# Altium PCB Power-PCB-v1.0.PcbDoc (part 1 of 3)
Units mil, origin at the board's own origin, x right, y up, seen from the top; angles counter-clockwise.
Board outline 5472.44 x 5472.44 mil, 2 copper layers (Top Layer, Bottom Layer), stack 61.855 mil thick; 76 components, 43 nets, 196 pads, 129 vias.
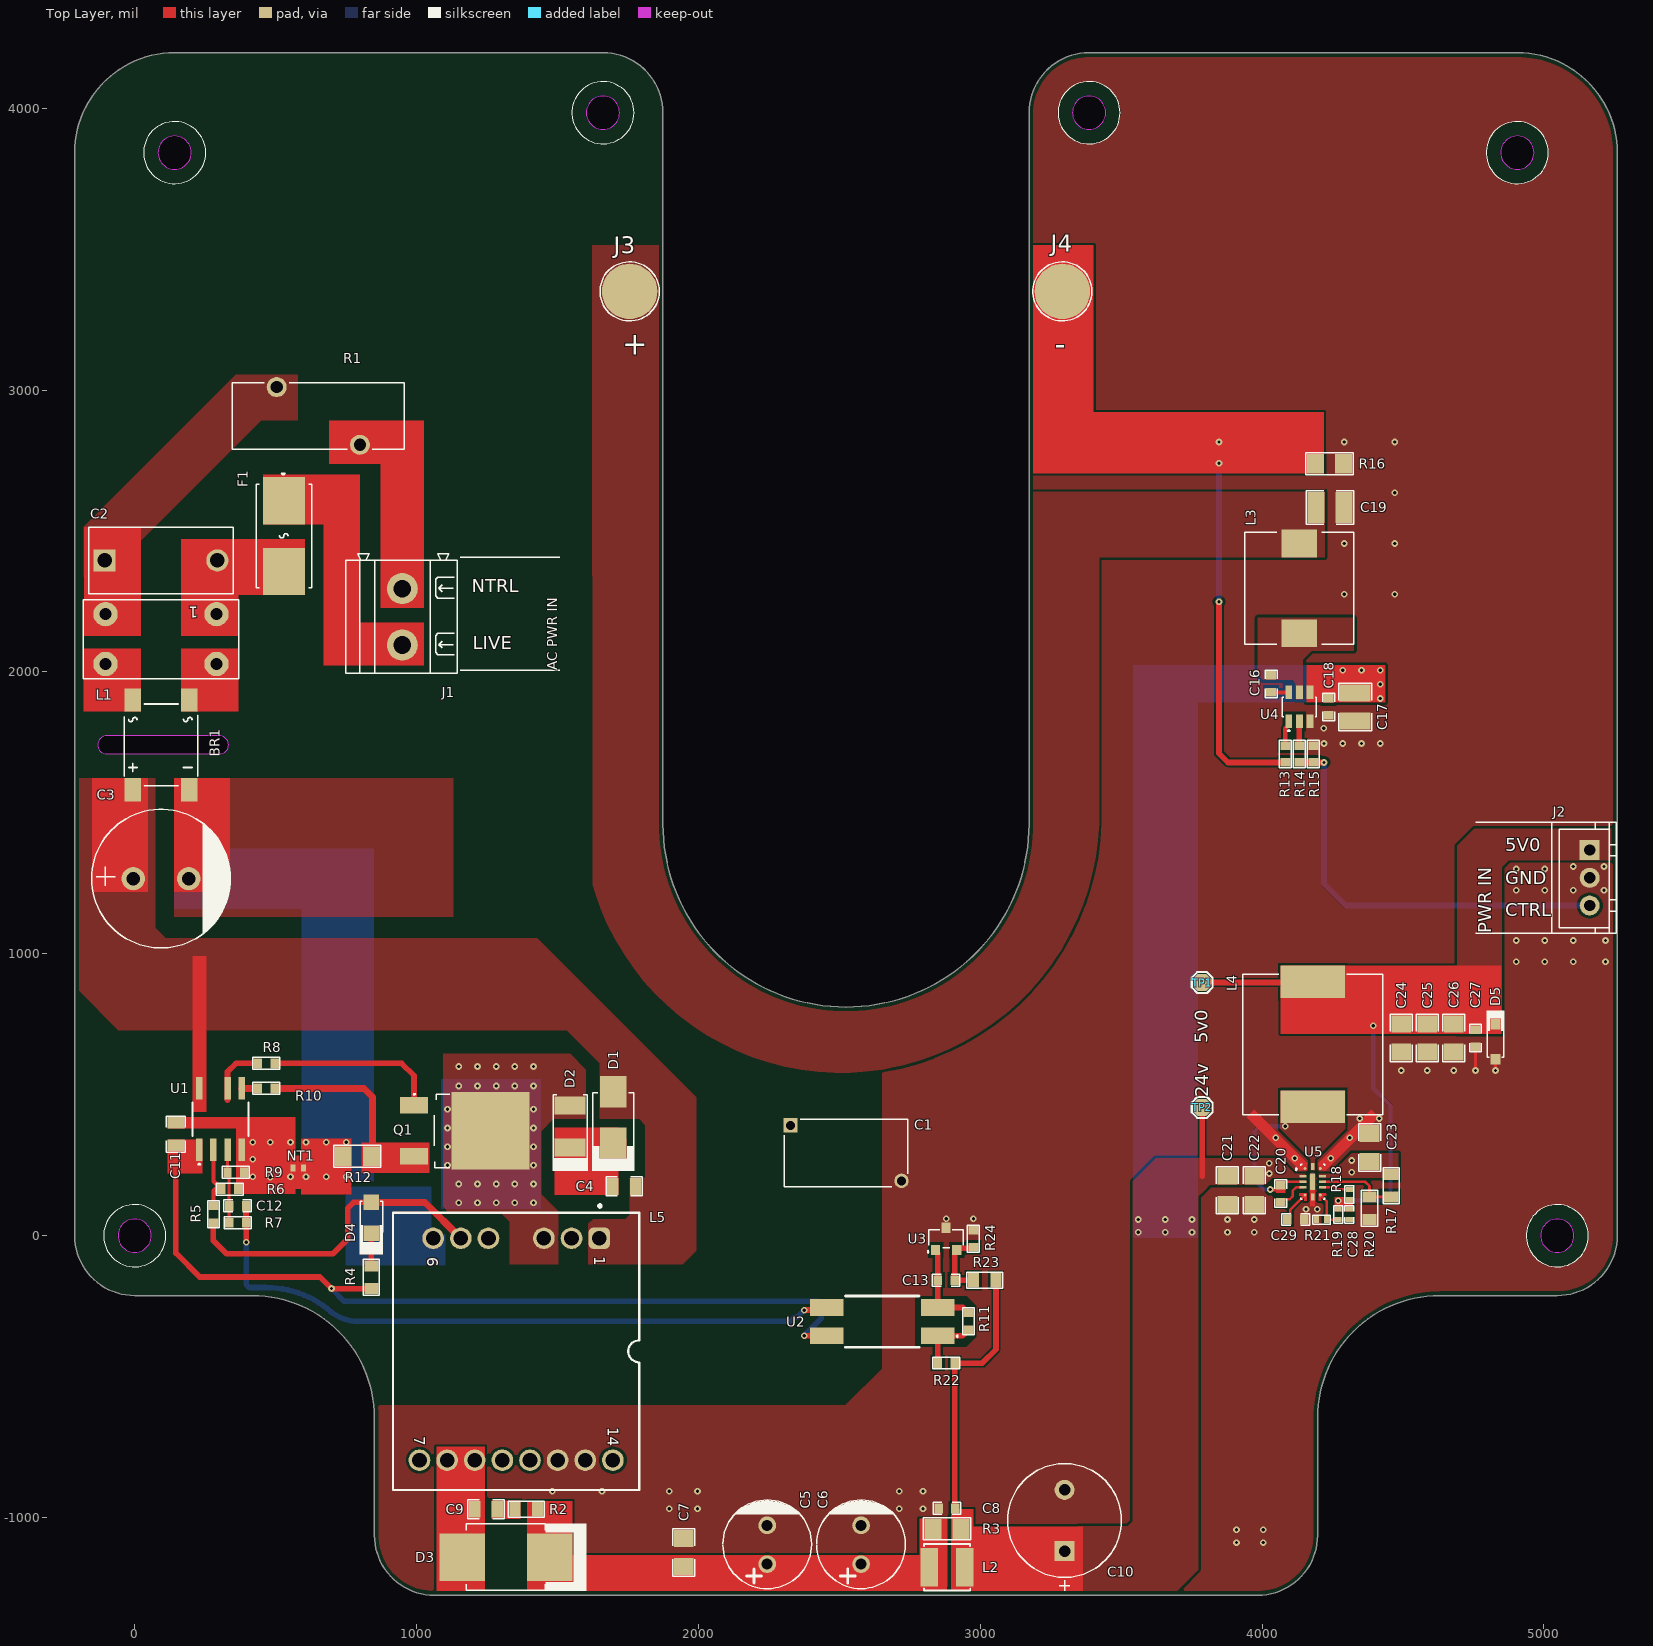
[diagram p0: Top Layer view]
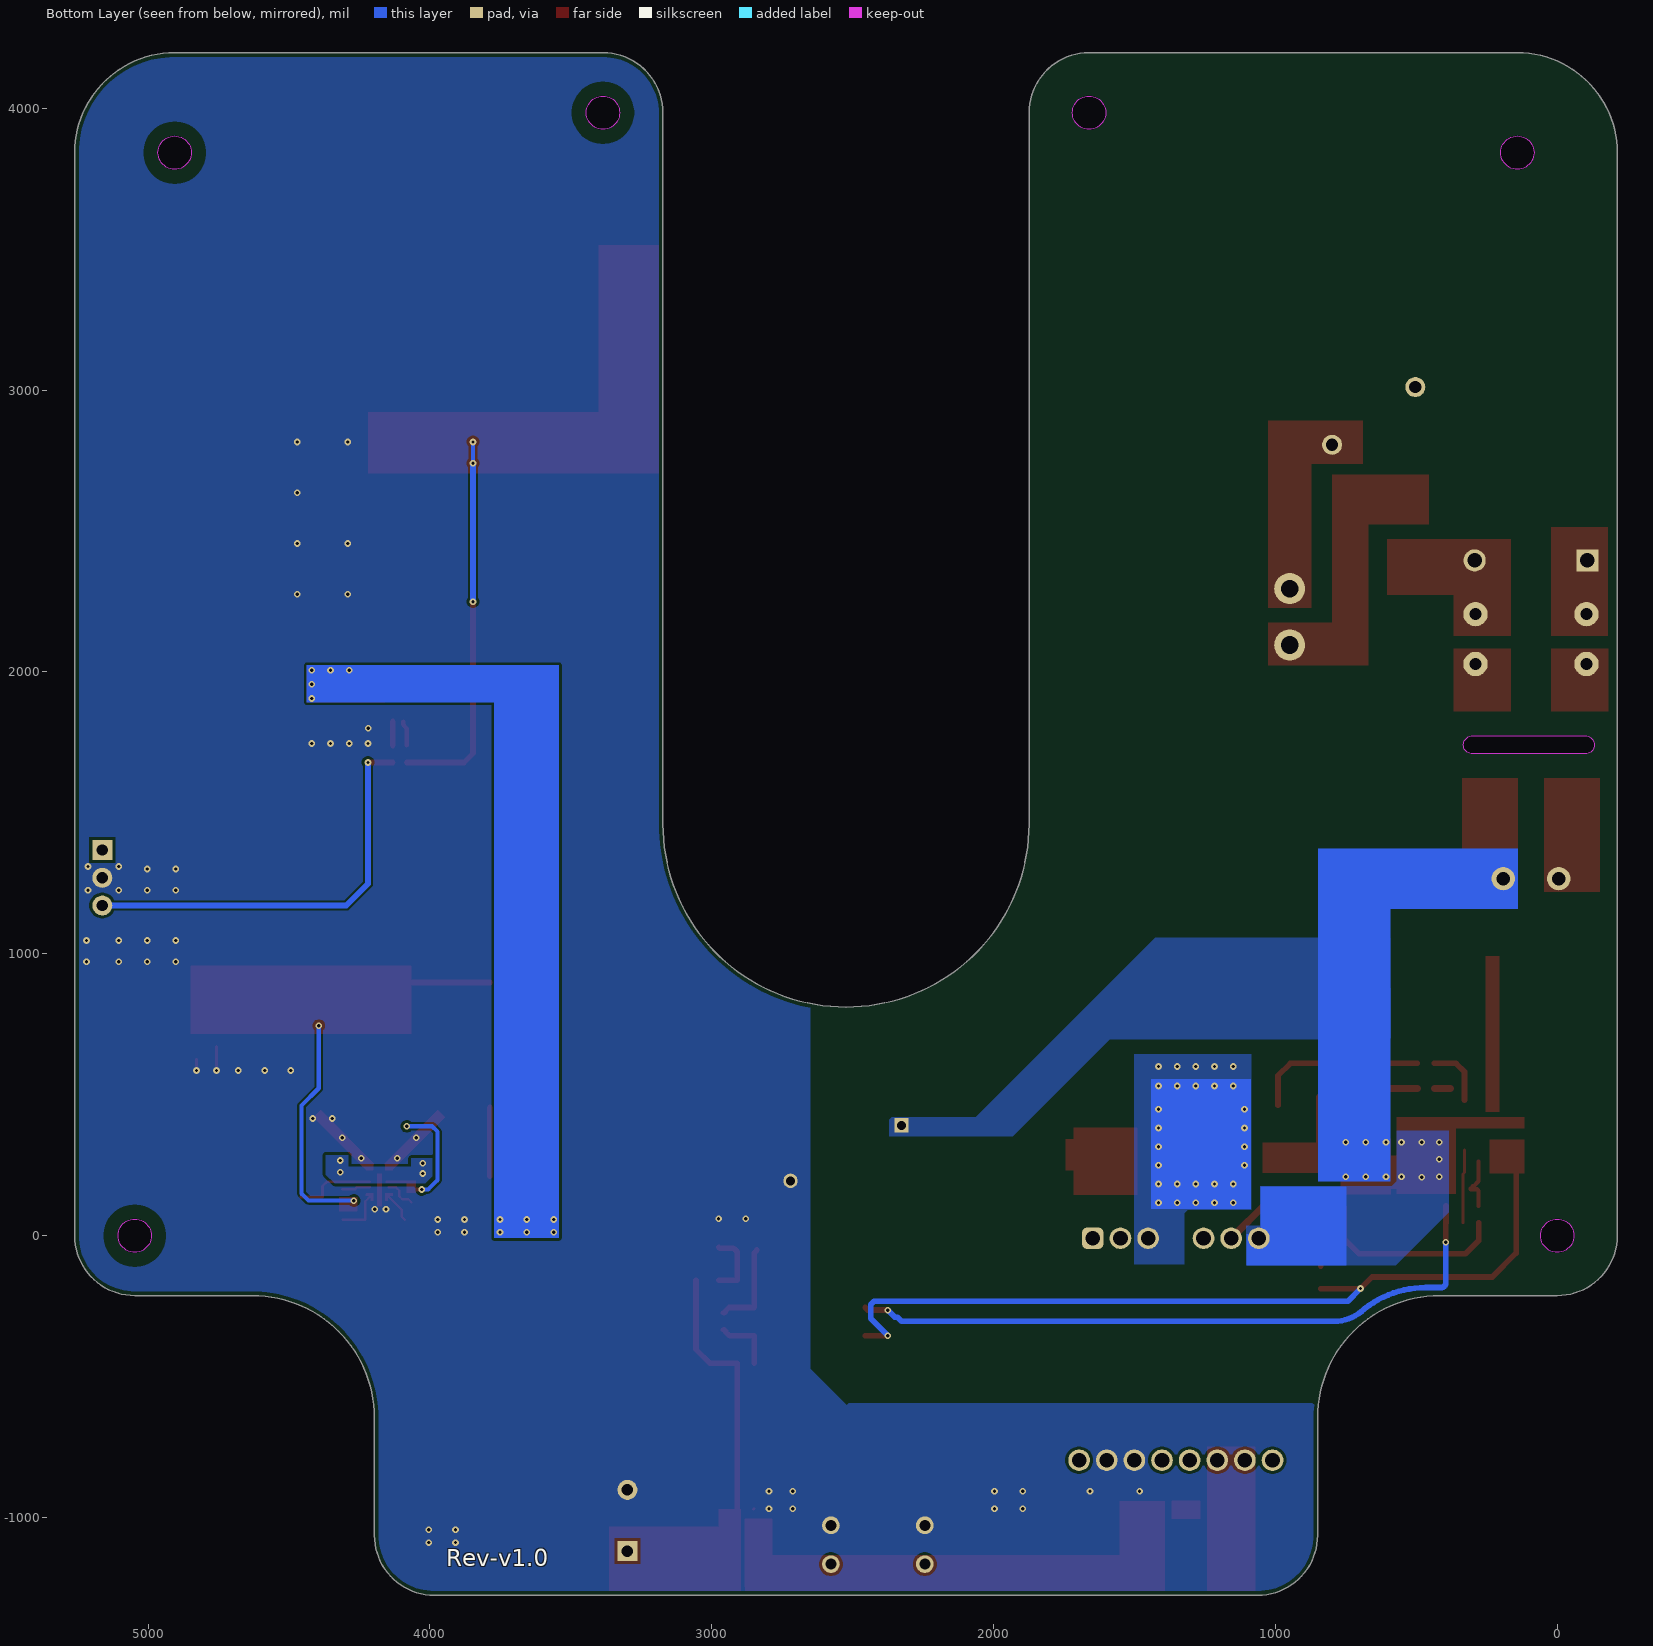
[diagram p1: Bottom Layer view, seen from below]
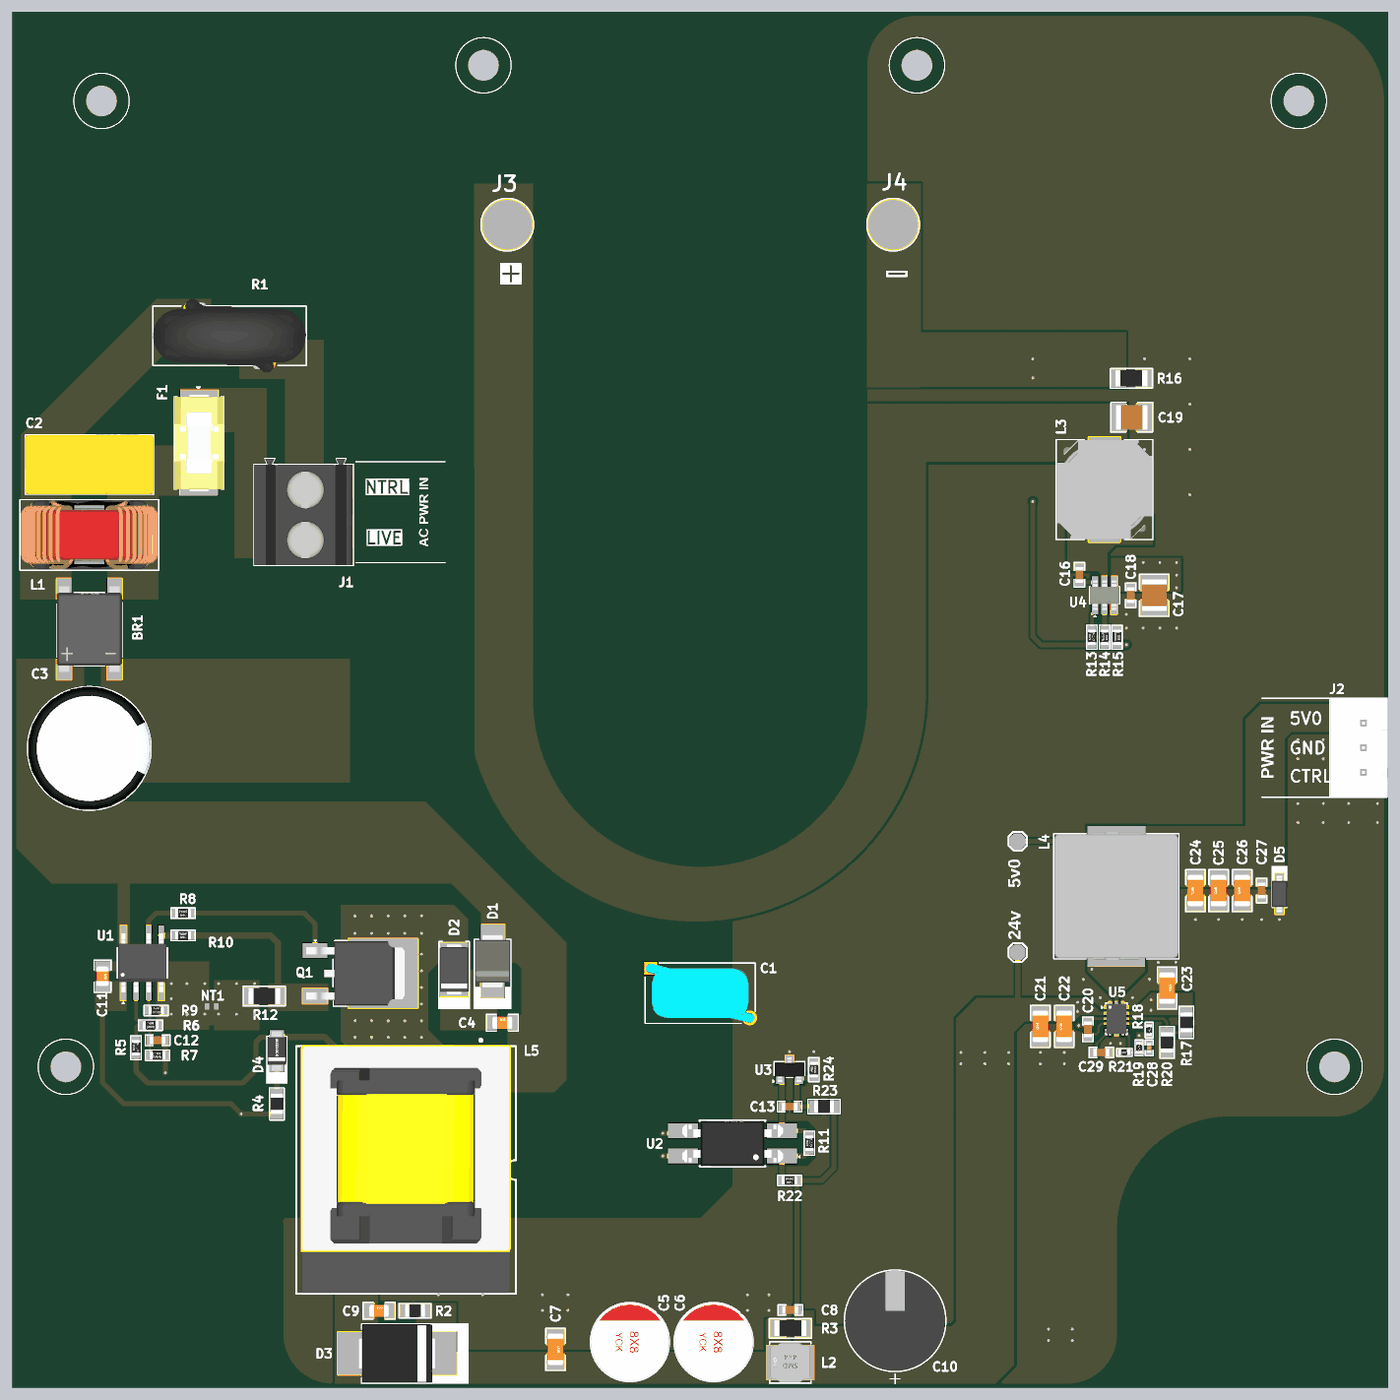
[diagram p3: 3D render of the assembled board from above, using the file's embedded part models]

## Layer stack, top to bottom
Top Solder: solder mask 0.4, Solder Resist, Dk 3.5
Top Layer: signal copper 1.4
Dielectric 1: dielectric 59.0551, FR-4, Dk 4.8
Bottom Layer: signal copper 1.4
Bottom Solder: solder mask 0.4, Solder Resist, Dk 3.5

## Board outline
0,-212.6 417.32,-212.6 cw(c417.32,-645.67) 850.39,-645.67 850.39,-1062.99 ccw(c1062.99,-1062.99) 1062.99,-1275.59 3984.25,-1275.59 ccw(c3984.25,-1062.99) 4196.85,-1062.99 4196.85,-645.67 cw(c4629.92,-645.67) 4629.92,-212.6 5047.24,-212.6 ccw(c5047.24,0) 5259.84,0 5259.84,3842.52 ccw(c4905.51,3842.52) 4905.51,4196.85 3385.83,4196.85 ccw(c3385.83,3984.25) 3173.23,3984.25 3173.23,1460.63 cw(c2523.62,1460.63) 1874.02,1460.63 1874.02,3984.25 ccw(c1661.42,3984.25) 1661.42,4196.85 141.73,4196.85 ccw(c141.73,3842.52) -212.6,3842.52 -212.6,0 ccw(c0,0)
cut-out: -99.46,1709.22 301.14,1709.22 ccw(c301.14,1741.26) 333.18,1741.26 ccw(c301.14,1741.26) 301.14,1773.3 -99.46,1773.3 ccw(c-99.46,1741.26) -131.5,1741.26 ccw(c-99.46,1741.26)
cut-out: 1602.36,3984.25 ccw(c1661.42,3984.25) 1661.42,3925.2 ccw(c1661.42,3984.25) 1720.47,3984.25 ccw(c1661.42,3984.25) 1661.42,4043.31 ccw(c1661.42,3984.25)
cut-out: 4988.19,0 ccw(c5047.24,0) 5047.24,-59.06 ccw(c5047.24,0) 5106.3,0 ccw(c5047.24,0) 5047.24,59.06 ccw(c5047.24,0)
cut-out: -59.06,0 ccw(c0,0) 0,-59.06 ccw(c0,0) 59.06,0 ccw(c0,0) 0,59.06 ccw(c0,0)
cut-out: 4846.46,3842.52 ccw(c4905.51,3842.52) 4905.51,3783.46 ccw(c4905.51,3842.52) 4964.57,3842.52 ccw(c4905.51,3842.52) 4905.51,3901.57 ccw(c4905.51,3842.52)
cut-out: 3326.77,3984.25 ccw(c3385.83,3984.25) 3385.83,3925.2 ccw(c3385.83,3984.25) 3444.88,3984.25 ccw(c3385.83,3984.25) 3385.83,4043.31 ccw(c3385.83,3984.25)
cut-out: 82.68,3842.52 ccw(c141.73,3842.52) 141.73,3783.46 ccw(c141.73,3842.52) 200.79,3842.52 ccw(c141.73,3842.52) 141.73,3901.57 ccw(c141.73,3842.52)

## Design rules (kind name [scope] priority, off if disabled: settings)
BoardOutlineClearance [All] p1: gap=0 ignorepadtopadclearanceinfootprint=FALSE except(15: Poly-OutlineEdge)
Clearance [All] p1: gap=10 ignorepadtopadclearanceinfootprint=TRUE except(7: Track-Track; 7.01: Arc-Track Arc-SMDPad Arc-Fill Arc-Poly Track-SMDPad Track-Fill Track-Poly SMDPad-Fill; 7.99: Fill-Fill; 8: Fill-Poly)
HoleSize [All] p1: absolutevalues=TRUE maxlimit=122.05 minlimit=1 maxpercent=80.000 minpercent=20.000
HoleToHoleClearance [All] p1: gap=0 allowstackedmicrovias=TRUE
MinimumSolderMaskSliver [All] p1: minsoldermaskwidth=0
PolygonConnect [All] p1: connectstyle=Direct reliefconductorwidth=10 reliefentries=4 polygonreliefangle="90 Angle" airgapwidth=10
RoutingVias [All] p1: holewidth=11.81 width=23.62 viastyle="Through Hole" minholewidth=11.81 minwidth=23.62 maxholewidth=11.81 maxwidth=23.62
SilkToSilkClearance [All] p1: silktosilkclearance=0
SilkToSolderMaskClearance [IsPad] p1: minsilkscreentomaskgap=0 clearancetoexposedcopper=TRUE
SolderMaskExpansion [All] p1: expansion=4 istentingtop=FALSE
SupplyNets "Schematic Supply Nets_7" [InNet('HV_DC')] p1: voltage=0.000
SupplyNets "Schematic Supply Nets_6" [InNet('P-SGND')] p2: voltage=0.000
SupplyNets "Schematic Supply Nets_5" [InNet('Live')] p3: voltage=0.000
SupplyNets "Schematic Supply Nets_4" [InNet('GND')] p4: voltage=0.000
SupplyNets "Schematic Supply Nets_3" [InNet('24V')] p5: voltage=0.000
SupplyNets "Schematic Supply Nets_2" [InNet('Neutral')] p6: voltage=0.000
SupplyNets "Schematic Supply Nets_1" [InNet('5V')] p7: voltage=0.000
SupplyNets "Schematic Supply Nets" [InNet('PGND')] p8: voltage=0.000
Width [All] p1: maxlimit=25 minlimit=7.99 preferedwidth=10 toplayer_minwidth=8 minimp=50.000000 maximp=50.000000 favimp=50.000000
25 further rules are at their usual default settings.

## Classes and differential pairs
component class U_Main_Power_Sheet: BR1 C1 C2 C3 C4 C5 C6 C7 C8 C9 C10 C11 C12 C13 D1 D2 D3 D4 F1 J1 L1 L2 L5 NT1 Q1 R1 R2 R3 R4 R5 R6 R7 R8 R9 R10 R11 R12 R22 R23 R24 U1 U2 U3
component class U_DRIVER_BUC_Sheet: C16 C17 C18 C19 C20 C21 C22 C23 C24 C25 C26 C27 C28 C29 D5 J2 J3 J4 L3 L4 R13 R14 R15 R16 R17 R18 R19 R20 R21 TP1 TP2 U4 U5

## Components (designator, comment, footprint, x,y, rotation, side; value= is the part's Value field where it differs from the comment)
BR1 "MSB40M" UMSB 93.4,1741.26 r90 top
C1 "1.5nF" DCF152M36Y5UG6BL0AA 2523.62,293.09 r0 top
C2 "100nF" MP2104K27C3X6LC 93.4,2395.81 r0 top
C3 "82uF" LKML2002E820MF 93.41,1266.81 r0 top
C4 "1000pF" Cap-0805 1736.44,175.11 r0 top
C5 "220uF" 35ZLH220MEFC8X11.5 2244.03,-1096.46 r90 top
C6 "220uF" 35ZLH220MEFC8X11.5 2577.03,-1096.46 r90 top
C7 "6.8uF" Cap-1206 1948.03,-1124.02 r270 top
C8 "0.1uF" Cap-0603 2882.03,-967.36 r0 top value=100nF
C9 "1000pF" Cap-0805 1246.39,-970.64 r0 top
C10 "470uF" ELXZ350ELL471MJ20S 3299.03,-1010.31 r90 top
C11 "10uF" Cap-0805 146.03,360.39 r270 top
C12 "47nF" Cap-0603 365.03,105.8 r180 top
C13 "560pF" Cap-0603 2879.03,-157.95 r0 top
C16 "0.1uF" Cap-0603 4032.03,1957.62 r90 top value=100nF
C17 "10uF" Cap-1210 4330.03,1876.05 r90 top
C18 "0.1uF" Cap-0603 4236.03,1876.05 r90 top value=100nF
C19 "10uF" Cap-1210 4240.85,2583.87 r180 top locked
C20 "0.1uF" Cap-0603 4066.03,149.05 r270 top value=100nF
C21 "4.7uF" Cap-1206 3877.03,161.05 r90 top
C22 "220nF" Cap-1206 3972.03,161.05 r90 top
C23 "220nF" Cap-1206 4381.03,313.16 r270 top
C24 "47uF" Cap-1206 4494.03,701.05 r90 top
C25 "47uF" Cap-1206 4586.03,701.05 r90 top
C26 "47uF" Cap-1206 4680.03,701.05 r90 top
C27 "0.1uF" Cap-0603 4757.03,701.05 r90 top value=100nF
C28 "6.8pF" Cap-0402 4309.65,75.73 r90 top
C29 "1uF" Cap-0603 4119.48,57.23 r180 top
D1 "SMBJ170A-TR" SMB_ 1697.7,420.14 r270 top
D2 "US1M-13-F" SMA(DO-214AC) 1544.44,387.31 r90 top value=10pF
D3 "MBRS4201T3G" SMC 1317.39,-1140.64 r180 top
D4 "PMEG10010ELRX" SOD-123W 839.44,62.99 r270 top value=28pF
D5 "AZ3005-01G" SOD-123 4828.03,687.9 r90 top
F1 "0154003.DR" 0154003.DR 530.03,2482.05 r270 top value=22.7mR
J1 "DB128L-5.08-2P-BK-S" DB128L-5.08-2P-BK-S 949.41,2195.63 r270 top
J2 "XH-3A" XH-3A 5162.24,1269.78 r90 top
J3 "5mm Pad SMD" "5mm Pad SMD" 1755.91,3350.39 r0 top
J4 "5mm Pad SMD" "5mm Pad SMD" 3291.34,3350.39 r0 top
L1 "744821201" 744821201 93.4,2116.81 r180 top
L2 "CR4030-1R0N" CR4030-1R0N 2882.03,-1176.36 r0 top
L3 "4.7uH" YSLF1045-4R7M 4132.03,2296.5 r90 top locked
L4 "15uH" SRP1265A-150M 4179.48,678.62 r270 top
L5 "750343466" 750343466 1353.44,-402.89 r270 top
NT1 "Net Tie_SMD" "Net Tie Pad" 580.03,240.05 r0 top net-tie
Q1 "SM600R65CT9RL" TO-252-2L 1126.52,371.94 r270 top
R1 "MF72 5D13" "MF72 5D13" 651.39,2908.41 r180 top
R2 "10R" RES-0805 1389.44,-970.64 r0 top
R3 "2R" Res-1206 2882.03,-1040.36 r0 top
R4 "10R" RES-0805 839.44,-147.61 r90 top
R5 "75K" Res-0603 279.31,75.8 r270 top value=75kR
R6 "24K" Res-0603 337.18,165.15 r180 top
R7 "100K" Res-0603 365.03,45.8 r180 top value=100kR
R8 "0R" Res-0603 466.45,611.39 r0 top
R9 "22K" Res-0603 359.31,224.5 r180 top value=22kR
R10 "2.7K" Res-0603 466.45,522.8 r0 top
R11 "1K" Res-0603 2958.18,-303.95 r270 top
R12 "0.43R" Res-1206 789.44,281.39 r0 top
R13 "0R" Res-0603 4082.43,1709.05 r270 top
R14 "1K" Res-0603 4132.03,1709.05 r90 top
R15 "100K" Res-0603 4181.64,1709.05 r90 top value=100kR
R16 "0.2R" Res-1206 4239.03,2739.05 r180 top value=200mR
R17 "698K" RES-0805 4458.03,177.23 r90 top value=698kR
R18 "100K" Res-0402 4309.65,146.09 r90 top
R19 "100K" Res-0402 4269.65,75.73 r90 top
R20 "51.1K" RES-0805 4381.03,97.23 r90 top value=51.1kR
R21 "24.9K" Res-0402 4210.86,57.23 r0 top
R22 "1.5K" Res-0603 2879.03,-451.95 r0 top
R23 "383K" RES-0805 3015.68,-157.95 r0 top
R24 "44.2K" Res-0603 2975.68,-11.32 r270 top
TP1 "TEST POINT" Test-point 3787.03,898.05 r0 top
TP2 "TEST POINT" Test-point 3787.03,455.05 r0 top
U1 "UCC28740DR" 7-SOIC 304.31,413.65 r90 top
U2 "LTV-817S-TA1-C" LTV-817S-TA1-C 2652.18,-304.95 r180 top
U3 "TL431BQDBZT" SOT-23 2879.03,-11.32 r0 top
U4 "TPS92200D2DDCR" SOT-23-6 4132.03,1876.05 r90 top
U5 "LM60440AQRPKRQ1" "13-WQFN-HR (3x2)" 4179.48,191.36 r0 top

## Footprints (in the part's own frame and the unit in brackets; to place one, negate y for a bottom-side part, rotate by r counter-clockwise, add the part's x,y. Pads: shape width x height; smd on the part's side, far side on the other; paste and mask are expansions set on the pad)
"5mm Pad SMD" [mm]
  round 5 smd: 1(0,0)
  silkscreen extent -2.66,-2.67 2.67,2.67
7-SOIC [mm]
  rect 2.045x0.588 smd: 1(-2.772,1.905) 2(-2.772,0.635) 3(-2.772,-0.635) 4(-2.772,-1.905) 5(2.772,-1.905) 6(2.772,-0.635) 7(2.772,1.905)
  silkscreen extent -4.1,-2.53 1.52,2.53, body extent -3,-2.45 3,2.45, height 1.75
"13-WQFN-HR (3x2)" [mm]
  round 0.244 smd: 1(-0.694,1.194) 5(-0.694,-1.194) 7(0.694,-1.194) 11(0.694,1.194)
  rrect40% 0.65x0.25 smd: 2(-0.875,0.5) 3(-0.875,0) 4(-0.875,-0.5) 8(0.875,-0.5) 9(0.875,0) 10(0.875,0.5)
  rrect29% 0.35x0.65 smd: 6(0,-1.375) 12(0,1.375)
  rrect22% 0.45x1.45 smd: 13(0,0)
  Top Layer region: 1.2,-1.075 1.2,-1.225 1.196,-1.244 1.185,-1.26 1.169,-1.271 1.15,-1.275 1.15,-1.275 0.825,-1.275 0.806,-1.279 0.79,-1.29 0.779,-1.306 0.775,-1.325 0.775,-1.325 0.775,-1.65 0.771,-1.669 0.76,-1.685 0.744,-1.696 0.725,-1.7 0.725,-1.7 0.575,-1.7 0.55,-1.693 0.532,-1.675 0.525,-1.65 0.525,-1.65 0.525,-1.075 0.529,-1.056 0.54,-1.04 0.556,-1.029 0.575,-1.025 0.575,-1.025 1.15,-1.025 1.169,-1.029 1.185,-1.04 1.196,-1.056 1.2,-1.075 1.2,-1.075
  Top Layer region: -0.575,-1.7 -0.725,-1.7 -0.744,-1.696 -0.76,-1.685 -0.771,-1.669 -0.775,-1.65 -0.775,-1.65 -0.775,-1.325 -0.779,-1.306 -0.79,-1.29 -0.806,-1.279 -0.825,-1.275 -0.825,-1.275 -1.15,-1.275 -1.169,-1.271 -1.185,-1.26 -1.196,-1.244 -1.2,-1.225 -1.2,-1.225 -1.2,-1.075 -1.193,-1.05 -1.175,-1.032 -1.15,-1.025 -1.15,-1.025 -0.575,-1.025 -0.556,-1.029 -0.54,-1.04 -0.529,-1.056 -0.525,-1.075 -0.525,-1.075 -0.525,-1.65 -0.529,-1.669 -0.54,-1.685 -0.556,-1.696 -0.575,-1.7 -0.575,-1.7
  Top Layer region: -1.2,1.225 -1.196,1.244 -1.185,1.26 -1.169,1.271 -1.15,1.275 -1.15,1.275 -0.825,1.275 -0.806,1.279 -0.79,1.29 -0.779,1.306 -0.775,1.325 -0.775,1.325 -0.775,1.65 -0.771,1.669 -0.76,1.685 -0.744,1.696 -0.725,1.7 -0.725,1.7 -0.575,1.7 -0.55,1.693 -0.532,1.675 -0.525,1.65 -0.525,1.65 -0.525,1.075 -0.529,1.056 -0.54,1.04 -0.556,1.029 -0.575,1.025 -0.575,1.025 -1.15,1.025 -1.169,1.029 -1.185,1.04 -1.196,1.056 -1.2,1.075 -1.2,1.075
  Top Layer region: 0.575,1.7 0.725,1.7 0.744,1.696 0.76,1.685 0.771,1.669 0.775,1.65 0.775,1.65 0.775,1.325 0.779,1.306 0.79,1.29 0.806,1.279 0.825,1.275 0.825,1.275 1.15,1.275 1.169,1.271 1.185,1.26 1.196,1.244 1.2,1.225 1.2,1.225 1.2,1.075 1.193,1.05 1.175,1.032 1.15,1.025 1.15,1.025 0.575,1.025 0.556,1.029 0.54,1.04 0.529,1.056 0.525,1.075 0.525,1.075 0.525,1.65 0.529,1.669 0.54,1.685 0.556,1.696 0.575,1.7 0.575,1.7
  silkscreen extent -1.52,-1.59 1.1,1.59, body extent -1,-1.5 1,1.5, height 0.7
35ZLH220MEFC8X11.5 [mm]
  round 1.6 hole 1: 1(-1.75,0) 2(1.75,0)
  silkscreen extent -3.96,-4 4.04,4, body extent -3.96,-4.01 4.04,4, height 8
0154003.DR [mil]
  rect 167x150 smd: 1(-125.5,0) 2(125.5,0)
  silkscreen extent -223,-99 184,99, body extent -192,-99 192,99, height 150
744821201 [mm]
  round 2.2 hole 1.1: 1(-5,-2.25) 2(5,-2.25) 3(5,2.25) 4(-5,2.25)
  silkscreen extent -7.01,-3.56 7.01,3.59, body extent -6.95,-3.5 6.95,3.54, height 16.82
750343466 [mm]
  rrect50% 1.95x1.95 hole 1.32: 1(-10,7.48)
  round 1.95 hole 1.32: 2(-10,4.99) 3(-10,2.5) 4(-10,-2.5) 5(-10,-4.99) 6(-10,-7.48) 7(10,-8.715) 8(10,-6.225) 9(10,-3.735) 10(10,-1.245) 11(10,1.245) 12(10,3.735) 13(10,6.225) 14(10,8.715)
  silkscreen extent -13.03,-11.1 12.69,11.1, body extent -12.45,-10.62 12.64,10.58, height 15.45
Cap-0402 [mil]
  rect 18x25 smd mask+2.36: 1(-18.5,0) 2(18.5,0)
  silkscreen extent -31,-16 31,16, body extent -20,-10 20,10, height 19
Cap-0603 [mil]
  rect 30x35 smd mask+2.36: 1(-30,0) 2(30,0)
  silkscreen extent -49,-21 49,21, body extent -32,-16 31,16, height 34
Cap-0805 [mil] "SMD 0805"
  rect 40x60 smd mask+2.76: 1(-40,0) 2(40,0)
  silkscreen extent -64,-34 64,34, body extent -39,-25 39,25, height 30
Cap-1206 [mil] "SMD 1206"
  rect 60x70 smd: 1(-50,0) 2(50,0)
  silkscreen extent -84,-39 84,39, body extent -63,-31 63,32, height 39
Cap-1210 [mil] "SMD 1210"
  rect 60x110 smd: 1(-50,0) 2(50,0)
  silkscreen extent -84,-59 84,59, body extent -63,-49 63,49, height 39
CR4030-1R0N [mm]
  rect 1.6x3.5 smd paste+0 mask+0.051: 1(-1.6,0) 2(1.6,0)
  silkscreen extent -2.08,-2.1 2.08,2.1, body extent -2.01,-2 2.01,2, height 1.87
DB128L-5.08-2P-BK-S [mm]
  round 2.8 hole 1.6: 1(-2.54,0) 2(2.54,0)
  silkscreen extent -5.7,-5.1 5.1,4.95, body extent -5.68,-5.12 5.08,4.88, height 14
DCF152M36Y5UG6BL0AA [mm]
  rect 1.3x1.3 hole 0.8: 1(-5,2.5) 1(-5,2.5)
  round 1.3 hole 0.8: 2(5,-2.5)
  silkscreen extent -5.56,-3.05 5.56,3.05, body extent -5.5,-3 5.5,3, height 11.99
ELXZ350ELL471MJ20S [mil]
  rect 70.87x70.87 hole 41: 1(-108.5,0)
  round 70.87 hole 41: 2(108.5,0)
  silkscreen extent -250,-202 202,202, body extent -197,-197 198,197, height 778
LKML2002E820MF [mm]
  round 2.1 hole 1.2 paste-2539.97 mask+0.05: 1(-2.5,0) 2(2.5,0)
  silkscreen extent -6.25,-6.25 6.25,6.25, body extent -6.24,-6.25 6.25,6.25, height 19.91
LTV-817S-TA1-C [mm]
  rect 3x1.5 smd: 1(-5,1.27) 2(-5,-1.27) 3(5,-1.27) 4(5,1.27)
  silkscreen extent -6.82,-2.3 3.3,2.3, body extent -5.1,-2.3 5.1,2.3, height 3.77
"MF72 5D13" [mm]
  round 1.8 hole 1.1 paste-2539.97 mask+0.051: 1(-3.75,2.6) 2(3.75,-2.6)
  silkscreen extent -7.75,-3 7.75,3, body extent -7.74,-3.74 7.74,3.74, height 19.59
MP2104K27C3X6LC [mm]
  rect 2x2 hole 1.3 paste-2539.97 mask+0.051: 1(-5.08,0)
  round 2 hole 1.3 paste-2539.97 mask+0.051: 2(5.08,0)
  silkscreen extent -6.5,-3 6.5,3, body extent -6.5,-3 6.5,3, height 12
"Net Tie Pad" [mil]
  rect 18x25 smd mask-10: 1(-18.5,0) 2(18.5,0)
  Top Layer region: -15,-74.39 15,-74.39 15,44 -15,44
Res-0402 [mil]
  rect 18x25 smd mask+2.17: 1(-18.5,0) 2(18.5,0)
  silkscreen extent -32,-17 32,16, body extent -23,-11 23,11, height 16
Res-0603 [mil]
  rect 30x35 smd: 1(-30,0) 2(30,0)
  silkscreen extent -48,-21 48,21, body extent -31,-17 31,17, height 18
RES-0805 [mil] "SMD 0805"
  rect 40x50 smd: 1(-40,0) 2(40,0)
  silkscreen extent -64,-29 64,29, body extent -39,-25 39,24, height 24
Res-1206 [mil]
  rect 60x70 smd: 1(-50,0) 2(50,0)
  silkscreen extent -84,-39 84,39, body extent -63,-31 63,31, height 24
SMA(DO-214AC) [mm]
  rect 1.6x2.8 smd: 1(-1.9,0) 2(1.9,0)
  silkscreen extent -3.99,-1.6 2.84,1.6, body extent -2.6,-1.45 2.6,1.45, height 2.3
SMB_ [mm]
  rect 2.8x2.4 smd: 1(-2.3,0) 2(2.3,0)
  silkscreen extent -2.21,-1.9 4.83,1.91, body extent -2.7,-1.8 2.7,1.8, height 2.3
SMC [mm]
  rect 4.1x4.3 smd: 1(-3.95,0) 2(3.95,0)
  silkscreen extent -7.24,-3.05 3.58,3.05, body extent -3.9,-2.95 3.9,2.95, height 2.41
SOD-123 [mm]
  rect 0.95x0.9 smd: 1(-1.575,0) 2(1.575,0)
  silkscreen extent -1.37,-0.8 2.82,0.8, body extent -1.82,-0.78 1.83,0.78, height 1.5
SOD-123W [mm] "DIODE SCHOTTKY 30V 1A SOD123W"
  rect 1.4x1.4 smd: 1(-1.4,0) 2(1.4,0)
  silkscreen extent -1.5,-1.07 3.3,1.07, body extent -2,-0.95 2,0.95, height 1.1
SOT-23 [mm] "TRANS NPN 40V 0.6A SOT23"
  rect 0.82x0.92 smd: 1(-0.95,-1) 2(0.95,-1) 3(0,1)
  silkscreen extent -1.68,-1.3 1.55,0.81, body extent -1.5,-1.25 1.5,1.25, height 1.05
SOT-23-6 [mm]
  rect 1.22x0.62 smd: 1(-1.31,0.95) 2(-1.31,0) 3(-1.31,-0.95) 4(1.31,-0.95) 5(1.31,0) 6(1.31,0.95)
  silkscreen extent -2.18,-1.52 0.86,1.52, body extent -1.5,-1.5 1.5,1.5, height 1.47
SRP1265A-150M [mm]
  rect 2.924x5.82 smd paste+0 mask+0.051: 1(5.628,0) 2(-5.628,0)
  silkscreen extent -6.33,-6.33 6.33,6.33, body extent -6.47,-6.25 6.43,6.25, height 6.31
Test-point [mil]
  oct 60x60 smd: 1(0,0)
  silkscreen extent -37,-37 37,37
TO-252-2L [mm]
  rect 1.5x2.5 smd: 1(-2.3,-3.45) 3(2.3,-3.45)
  rect 7x7 smd: 2(0,3.45)
  silkscreen extent -3.35,-3.53 3.33,-0.2, body extent -3.27,-4.31 3.27,5.63, height 2.34
UMSB [mm]
  rect 2.105x1.47 smd: 1(-4.052,2.55) 2(-4.052,-2.55) 3(4.052,-2.55) 4(4.052,2.55)
  silkscreen extent -3.68,-3.3 3.68,3.3, body extent -4.32,-3.3 4.33,3.3, height 1.4
XH-3A [mm]
  rect 1.8x1.8 hole 1 paste-2539.97 mask+0.05: 1(2.5,0)
  round 1.8 hole 1 paste-2539.97 mask+0.05: 2(0,0) 3(-2.5,0)
  silkscreen extent -5,-2.4 5,3.4, body extent -5,-2.4 5,3.3, height 7
YSLF1045-4R7M [mm]
  rect 2.5x3.2 smd: 1(-4.05,0) 2(4.05,0)
  silkscreen extent -5.05,-4.9 5.05,4.9, body extent -5,-4.85 5,4.85, height 4.5

## Part data
BR1: "1.1V@4A 4A 1000V UMSB Bridge Rectifiers ROHS", LCSC Part Number=C2985033, Manufacturer=GOODWORK, Package=UMSB, ComponentLink1Description=LCSC, ComponentLink1URL=https://www.lcsc.com/product-detail/Bridge-Rectifiers_GOODWORK-MSB40M_C2985033.html, Item Type="Bridge Rectifire", Manufacturer Part Number=MSB40M
C1: library part DCF152M36Y5UG6BL0AA, "1.5nF ±20% X1,Y1 Plugin,P=10mm Safety Capacitors ROHS", LCSC Part Number=C2919099, Manufacturer=SHM, Package=Plugin,P=10mm, ComponentLink1Description=LCSC, ComponentLink1URL=https://www.lcsc.com/product-detail/Safety-Capacitors_SHM-DCF152M36Y5UG6BL0AA_C2919099.html?s_z=n_DE2E3KY152MN3AM02F, Item Type=Capacitor, Manufacturer Part Number=DCF152M36Y5UG6BL0AA
C2: library part MP2104K27C3X6LC, "100nF ±10% X2 275V Plugin,P=10mm Safety Capacitors ROHS", LCSC Part Number=C105759, Manufacturer="SRD(Shenzhen Sincerity Tech)", Package=Plugin,P=10mm, ComponentLink1Description=LCSC, ComponentLink1URL=https://www.lcsc.com/product-detail/Safety-Capacitors_SRD-Shenzhen-Sincerity-Tech-MP2104K27C3X6LC_C105759.html, Item Type=Capacitor, Manufacturer Part Number=MP2104K27C3X6LC
C3: library part LKML2002E820MF, "82uF 250V 1.35Ω@100kHz ±20% 1.27A@100kHz Plugin,D12.5xL20mm Aluminum Electrolytic Capacitors - Leaded ROHS", LCSC Part Number=C443261, Manufacturer=Ymin, Package=Plugin,D12.5xL20mm, ComponentLink1Description=LCSC, ComponentLink1URL=https://www.lcsc.com/product-detail/Aluminum-Electrolytic-Capacitors-Leaded_Ymin-LKML2002E820MF_C443261.html, Item Type=Capacitor, Manufacturer Part Number=LKML2002E820MF
C4 C9: library part 0805B102K631NT, "630V 1000pF X7R ±10% 0805 Multilayer Ceramic Capacitors MLCC - SMD/SMT ROHS", LCSC Part Number=C20617885, Manufacturer="FH (Guangdong Fenghua Advanced Tech)", Package=0805, ComponentLink1Description=LCSC, ComponentLink1URL=https://www.lcsc.com/product-detail/Multilayer-Ceramic-Capacitors-MLCC-SMD-SMT_FH-Guangdong-Fenghua-Advanced-Tech-0805B102K631NT_C20617885.html?s_z=n_%2520C0805C102JBRACTU, Item Type=Capacitor, Manufacturer Part Number=0805B102K631NT
C5 C6: library part 35ZLH220MEFC8X11.5, "220uF 35V 472.5mA@120Hz ±20% Plugin,D8xL11.5mm Aluminum Electrolytic Capacitors - Leaded ROHS", LCSC Part Number=C107639, Manufacturer=Rubycon, Package=Plugin,D8xL11.5mm, ComponentLink1Description=LCSC, ComponentLink1URL=https://www.lcsc.com/product-detail/Aluminum-Electrolytic-Capacitors-Leaded_Rubycon-35ZLH220MEFC8X11-5_C107639.html?s_z=n_EKZE350ELL221MJC5S, Item Type=Capacitor, Manufacturer Part Number=35ZLH220MEFC8X11.5
C7: library part C3216X7R1V685KT000E, "CAP CER 6.8UF 35V X7R 1206", LCSC Part Number=C342646, Manufacturer="TDK Corporation", Manufacturer Part Number=C3216X7R1V685K160AC, Package=1206, ComponentLink1Description=LCSC, ComponentLink1URL=https://www.lcsc.com/product-detail/Multilayer-Ceramic-Capacitors-MLCC-SMD-SMT_TDK-C3216X7R1V685KT000E_C342646.html?s_z=n_C2012X5R1V685K125AC, Item Type=Capacitor
C8 C16 C18: library part GCM188R71H104KA57J, "CAP CER 0.1UF 50V X7R 0603", Case Code (Imperial)=0603, Case Code (Metric)=1608, Dielectric=X7R, LCSC Part Number=81-GCM188R71H104KA7J, Manufacturer=Murata, Max Operating Temperature=125°C, Min Operating Temperature=-55°C, Package Quantity=1, Ratings=AEC-Q200, Tolerance=10%, Voltage Rating=50V, Case/Package=0603, ComponentLink1Description=https://datasheet.ciiva.com/29540/product-29540815.pdf?src-supplier=Digikey, ComponentLink1URL=https://datasheet.ciiva.com/29540/product-29540815.pdf?src-supplier=Digikey, ComponentLink2Description=https://datasheet.ciiva.com/11618/product-11618920.pdf?src-supplier=Avnet, ComponentLink2URL=https://datasheet.ciiva.com/11618/product-11618920.pdf?src-supplier=Avnet, Construction=Flat, Depth=0.8mm, Height=0.8mm, Item Type=Capacitors, Lead Free=5697LeadFree, Length=1.6mm, Manufacturer Part Number=GCM188R71H104KA57J, Material=4241ConductorMaterial, Mounting Technology="Surface Mount", Packaging="Tape and Reel", Pricing="1=0.19, 10=0.121, 50=0.121, 100=0.064, 1000=0.051, 10000=0.035 (USD)", Radiation Hardening=No, RoHS=Yes, RoHS Compliant=Yes, Series=GCM, Stock=469972, Supplier=Mouser, Termination=SMD/SMT, Thickness=0.035inch, Voltage Rating (DC)=50V, Width=0.031inch
C10: library part ELXZ350ELL471MJ20S, "CAP ALUM 470UF 20% 35V RADIAL", Case/Package=Radial, Dielectric Material=Aluminium, ESR (Equivalent Series Resistance)=52mR, LCSC Part Number=C1669323, Max Operating Temperature=105°C, Min Operating Temperature=-55°C, Package Quantity=2000, Ratings=AEC-Q200, Ripple Current=1.22A, Supplier Part Number=390120, Tolerance=20%, Voltage Rating=35V, Category="Aluminum Electrolytic Capacitors", ComponentLink1Description=LCSC, ComponentLink2Description=https://datasheet.ciiva.com/15165/getdatasheetpartid-102547-15165912.pdf?src-supplier=Verical, ComponentLink2URL=https://datasheet.ciiva.com/15165/getdatasheetpartid-102547-15165912.pdf?src-supplier=Verical, ComponentLink3Description=https://datasheet.ciiva.com/15948/20cat-db-al-cgieejppdfnamelxz-cgieejppdfnamelxz-15948790.pdf?src-supplier=Onlinecomponents.com, ComponentLink3URL=https://datasheet.ciiva.com/15948/20cat-db-al-cgieejppdfnamelxz-cgieejppdfnamelxz-15948790.pdf?src-supplier=Onlinecomponents.com, ComponentLink4Description=https://datasheet.ciiva.com/22620/1697097-22620536.pdf?src-supplier=Element14, ComponentLink4URL=https://datasheet.ciiva.com/22620/1697097-22620536.pdf?src-supplier=Element14, ComponentLink5Description=https://datasheet.ciiva.com/7910/1348889-7910316.pdf?src-supplier=Element14, ComponentLink5URL=https://datasheet.ciiva.com/7910/1348889-7910316.pdf?src-supplier=Element14, ComponentLink6Description=https://datasheet.ciiva.com/29247/447742-da-01-en-elko-470-uf-35v-105c-2000st-29247655.pdf?src-supplier=Conrad, ComponentLink6URL=https://datasheet.ciiva.com/29247/447742-da-01-en-elko-470-uf-35v-105c-2000st-29247655.pdf?src-supplier=Conrad, Construction=RADIAL, Diameter=10mm, Height=20mm, Impedance=52mR, Item Type=Capacitor, Lead Diameter=0.6mm, Lead Free="Lead Free", Lead Pitch=5mm, Length=20mm, Life (Hours)=5000Hour, Mounting Technology="Through Hole", Packaging=Bulk, Pricing="5=0.094, 25=0.54, 50=0.512, 100=0.488, 250=0.476 (GBP)", Radiation Hardening=No, Reach SVHC Compliant=Unknown, RoHS=Yes, RoHS Compliant=Yes, Series=LXZ, Stock=615, Supplier=Rs, Termination=Radial, Voltage Rating (DC)=35V
C11: library part CGA0805X5R106K350MT, "35V 10uF X5R ±10% 0805 Multilayer Ceramic Capacitors MLCC - SMD/SMT ROHS", LCSC Part Number=C6119888, Manufacturer=HRE, Package=0805, ComponentLink1Description=LCSC, ComponentLink1URL=https://www.lcsc.com/product-detail/Multilayer-Ceramic-Capacitors-MLCC-SMD-SMT_HRE-CGA0805X5R106K350MT_C6119888.html?s_z=n_C2012X5R1V106K085AC, Item Type=Capacitor, Manufacturer Part Number=CGA0805X5R106K350MT
C12: library part CC0603KRX7R9BB473, "CAP CER 0.047UF 50V X7R 0603", LCSC Part Number=C107093, Manufacturer=Yageo, ComponentLink1Description=https://datasheet.ciiva.com/26862/getdatasheetpartid-403593-26862863.pdf?src-supplier=Verical, ComponentLink1URL=https://datasheet.ciiva.com/26862/getdatasheetpartid-403593-26862863.pdf?src-supplier=Verical, ComponentLink2Description=https://datasheet.ciiva.com/11786/0900766b80d84f1d-11786072.pdf?src-supplier=Rs, ComponentLink2URL=https://datasheet.ciiva.com/11786/0900766b80d84f1d-11786072.pdf?src-supplier=Rs, ComponentLink3Description=https://datasheet.ciiva.com/176/mlccorderingcode-176544.pdf?src-supplier=Digikey, ComponentLink3URL=https://datasheet.ciiva.com/176/mlccorderingcode-176544.pdf?src-supplier=Digikey, ComponentLink4Description=https://datasheet.ciiva.com/176/mlccorderingcode-176545.pdf?src-supplier=Digikey, ComponentLink4URL=https://datasheet.ciiva.com/176/mlccorderingcode-176545.pdf?src-supplier=Digikey, ComponentLink5Description=https://datasheet.ciiva.com/176/mlccorderingcode-176546.pdf?src-supplier=Digikey, ComponentLink5URL=https://datasheet.ciiva.com/176/mlccorderingcode-176546.pdf?src-supplier=Digikey, ComponentLink6Description=https://datasheet.ciiva.com/28450/1489800-28450670.pdf?src-supplier=Element14, ComponentLink6URL=https://datasheet.ciiva.com/28450/1489800-28450670.pdf?src-supplier=Element14, Halogen Free=5694HalogenFree, Item Type=Capacitors, Lead Free=5697LeadFree, Manufacturer Part Number=CC0603KRX7R9BB473, Material=4241ConductorMaterial, Pricing="4000=0.003, 16000=0.0029, 60000=0.0028, 160000=0.0027, 400000=0.0026 (USD)", RoHS=Yes, Stock=2716000, Supplier="Future Electronics"
C13: library part CC0603KRX7R9BB561, "CAP CER 560PF 50V X7R 0603", Dielectric Material=4241ConductorMaterial, Insulation Resistance=100GR, LCSC Part Number=C107094, Manufacturer=Yageo, Voltage Rating (AC)=50V, ComponentLink1Description=https://datasheet.ciiva.com/8033/1489800-8033866.pdf?src-supplier=Element14, ComponentLink1URL=https://datasheet.ciiva.com/8033/1489800-8033866.pdf?src-supplier=Element14, ComponentLink2Description=https://datasheet.ciiva.com/144/mlccorderingcode-144466.pdf?src-supplier=Digikey, ComponentLink2URL=https://datasheet.ciiva.com/144/mlccorderingcode-144466.pdf?src-supplier=Digikey, ComponentLink3Description=https://datasheet.ciiva.com/144/mlccorderingcode-144467.pdf?src-supplier=Digikey, ComponentLink3URL=https://datasheet.ciiva.com/144/mlccorderingcode-144467.pdf?src-supplier=Digikey, ComponentLink4Description=https://datasheet.ciiva.com/144/mlccorderingcode-144468.pdf?src-supplier=Digikey, ComponentLink4URL=https://datasheet.ciiva.com/144/mlccorderingcode-144468.pdf?src-supplier=Digikey, ComponentLink5Description=https://datasheet.ciiva.com/11465/upy-gphc-x7r-6-3v-to-50v-8-11465256.pdf?src-supplier=Avnet, ComponentLink5URL=https://datasheet.ciiva.com/11465/upy-gphc-x7r-6-3v-to-50v-8-11465256.pdf?src-supplier=Avnet, Halogen Free=5694HalogenFree, Item Type=Capacitors, Lead Free=5697LeadFree, Manufacturer Part Number=CC0603KRX7R9BB561, Material=4241ConductorMaterial, Pricing="1=0.1, 10=0.035, 100=0.0204, 1000=0.01285 (USD)", RoHS=Yes, Stock=209062, Supplier=Digikey
C17 C19: library part CC1210KKX7R9BB106, "CAP CER 10UF 50V X7R 1210", Case Code (Imperial)=1210, Case Code (Metric)=3225, Dielectric=X7R, LCSC Part Number=C596319, Manufacturer=Yageo, Max Operating Temperature=125°C, Min Operating Temperature=-55°C, Tolerance=10%, Voltage Rating=50V, Case/Package=1210, ComponentLink1Description=https://datasheet.octopart.com/CC1210KKX7R9BB106-Yageo-datasheet-147453679.pdf?src-supplier=Newark, ComponentLink1URL=https://datasheet.octopart.com/CC1210KKX7R9BB106-Yageo-datasheet-147453679.pdf?src-supplier=Newark, ComponentLink2Description=https://datasheet.octopart.com/CC1210KKX7R9BB106-Yageo-datasheet-166511530.pdf?src-supplier=Future+Electronics, ComponentLink2URL=https://datasheet.octopart.com/CC1210KKX7R9BB106-Yageo-datasheet-166511530.pdf?src-supplier=Future+Electronics, ComponentLink3Description=http://www.yageo.com/documents/recent/UPY-GPHC_X7R_6.3V-to-50V_18.pdf?src-supplier=Digikey, ComponentLink3URL=http://www.yageo.com/documents/recent/UPY-GPHC_X7R_6.3V-to-50V_18.pdf?src-supplier=Digikey, ComponentLink4Description=http://www.yageo.com/exep/pages/download/literatures/ProductSelectionGuide%202014_Final_2.pdf?src-supplier=Digikey, ComponentLink4URL=http://www.yageo.com/exep/pages/download/literatures/ProductSelectionGuide%202014_Final_2.pdf?src-supplier=Digikey, ComponentLink5Description=https://datasheet.octopart.com/CC1210KKX7R9BB106-Yageo-datasheet-151948686.pdf?src-supplier=Farnell, ComponentLink5URL=https://datasheet.octopart.com/CC1210KKX7R9BB106-Yageo-datasheet-151948686.pdf?src-supplier=Farnell, Halogen Free="Halogen Free", Item Type=Capacitors, Lead Free="Lead Free", Length=0.126inch, Manufacturer Part Number=CC1210KKX7R9BB106, Mounting Technology="Surface Mount", Packaging="Cut Tape", RoHS=Yes, RoHS Compliant=Yes, Series=CC, Stock=76, Supplier=Farnell, Thickness=0.11inch, Voltage Rating (DC)=50V, Width=0.098inch
C20 C27: library part CL10B104KB8WPNC, "CAP CER 0.1UF 50V X7R 0603", Case Code (Imperial)=0603, Case Code (Metric)=1608, LCSC Part Number=C307348, Max Operating Temperature=125°C, Min Operating Temperature=-55°C, Ratings=AEC-Q200, Supplier Part Number=2575919, Tolerance=10%, Voltage Rating=50V, Case/Package=0603, Category="Ceramic Capacitors", ComponentLink1Description=LCSC, ComponentLink2Description=http://www.farnell.com/datasheets/2710560.pdf?src-supplier=Farnell, ComponentLink2URL=http://www.farnell.com/datasheets/2710560.pdf?src-supplier=Farnell, ComponentLink3Description=http://www.samsungsem.com/kr/support/product-search/mlcc/CL10B104KB8WPNC.jsp?src-supplier=Digi-Key, ComponentLink3URL=http://www.samsungsem.com/kr/support/product-search/mlcc/CL10B104KB8WPNC.jsp?src-supplier=Digi-Key, ComponentLink4Description=http://www.farnell.com/datasheets/2710560.pdf?src-supplier=Element14, ComponentLink4URL=http://www.farnell.com/datasheets/2710560.pdf?src-supplier=Element14, ComponentLink5Description=https://datasheet.octopart.com/CL10B104KB8WPNC-Samsung-Electro-Mechanics-datasheet-120093645.pdf?src-supplier=Future+Electronics, ComponentLink5URL=https://datasheet.octopart.com/CL10B104KB8WPNC-Samsung-Electro-Mechanics-datasheet-120093645.pdf?src-supplier=Future+Electronics, ComponentLink6Description=http://www.farnell.com/datasheets/2710560.pdf?src-supplier=Newark, ComponentLink6URL=http://www.farnell.com/datasheets/2710560.pdf?src-supplier=Newark, ComponentLink7Description=http://www.samsungsem.com/servlet/FileDownload?type=spec&file=CL10B104KB8WPNC.pdf&src-supplier=Avnet, ComponentLink7URL=http://www.samsungsem.com/servlet/FileDownload?type=spec&file=CL10B104KB8WPNC.pdf&src-supplier=Avnet, ComponentLink8Description=https://datasheet.octopart.com/CL10B104KB8WPNC-Samsung-datasheet-8326407.pdf?src-supplier=TME, ComponentLink8URL=https://datasheet.octopart.com/CL10B104KB8WPNC-Samsung-datasheet-8326407.pdf?src-supplier=TME, Height=900um, Item Type=Capacitor, Lead Free=5697LeadFree, Material=4241ConductorMaterial, Mounting Technology="Surface Mount", Packaging="Cut Tape", Pricing="100=0.021, 500=0.019, 1000=0.015, 2000=0.01 (GBP)", RoHS=Yes, RoHS Compliant=Yes, Series=CL, Stock=400, Supplier=Rs, Voltage Rating (DC)=50V
C21: library part UMK316AB7475KL-T, "CAP CER 4.7UF 50V X7R 1206", Case Code (Imperial)=1206, Case Code (Metric)=3216, Dielectric=X7R, LCSC Part Number=C92853, Manufacturer="Taiyo Yuden", Max Operating Temperature=125°C, Min Operating Temperature=-55°C, Package Quantity=2000, Tolerance=10%, Voltage Rating=50V, Case/Package=1206, ComponentLink1Description=https://datasheet.ciiva.com/170/umk316ab7475kl-t-ss-170928.pdf?src-supplier=Digikey, ComponentLink1URL=https://datasheet.ciiva.com/170/umk316ab7475kl-t-ss-170928.pdf?src-supplier=Digikey, ComponentLink2Description=https://datasheet.ciiva.com/2990/umk316ab7475kl-t-ss-2990070.pdf?src-supplier=Avnet, ComponentLink2URL=https://datasheet.ciiva.com/2990/umk316ab7475kl-t-ss-2990070.pdf?src-supplier=Avnet, ComponentLink3Description=https://datasheet.ciiva.com/15922/1010umk316ab7475kl-t-15922628.pdf?src-supplier=Onlinecomponents.com, ComponentLink3URL=https://datasheet.ciiva.com/15922/1010umk316ab7475kl-t-15922628.pdf?src-supplier=Onlinecomponents.com, ComponentLink4Description=https://datasheet.ciiva.com/7975/1481447-7975911.pdf?src-supplier=Element14, ComponentLink4URL=https://datasheet.ciiva.com/7975/1481447-7975911.pdf?src-supplier=Element14, ComponentLink5Description=https://datasheet.ciiva.com/5413/mlcc-all-e-541559-5413006.pdf?src-supplier=Mouser, ComponentLink5URL=https://datasheet.ciiva.com/5413/mlcc-all-e-541559-5413006.pdf?src-supplier=Mouser, Construction=Flat, Depth=1.6mm, Height=1.6mm, Item Type=Capacitor, Length=3.2mm, Manufacturer Part Number=UMK316AB7475KL-T, Mounting Technology="Surface Mount", Packaging="Tape and Reel", Pins=2, Pricing="1=0.3, 10=0.198, 50=0.146, 100=0.1189, 500=0.09386, 1000=0.07925 (USD)", Radiation Hardening=No, Reach SVHC Compliant=Unknown, RoHS=Yes, RoHS Compliant=Yes, Series=M, Stock=392550, Supplier=Digikey, Termination=SMD/SMT, Voltage Rating (DC)=50V, Width=1.6mm
C22 C23: library part CC1206JKX7R9BB224, "CAP CER 0.22UF 50V X7R 1206", LCSC Part Number=C527274, Manufacturer=Yageo, Supplier Part Number=4639209, Category="Ceramic Capacitors", ComponentLink1Description=https://datasheet.ciiva.com/13210/upy-gp-np0-16v-to-50v-8-13210060.pdf?src-supplier=Mouser, ComponentLink1URL=https://datasheet.ciiva.com/13210/upy-gp-np0-16v-to-50v-8-13210060.pdf?src-supplier=Mouser, ComponentLink2Description=https://datasheet.ciiva.com/11466/upy-gphc-x7r-6-3v-to-50v-8-11466351.pdf?src-supplier=Avnet, ComponentLink2URL=https://datasheet.ciiva.com/11466/upy-gphc-x7r-6-3v-to-50v-8-11466351.pdf?src-supplier=Avnet, Item Type=Capacitor, Manufacturer Part Number=CC1206JKX7R9BB224, Pricing="3000=0.0381, 9000=0.0366, 15000=0.036, 30000=0.0351, 60000=0.0337 (USD)", RoHS=Yes, Stock=3000, Supplier="Future Electronics"
C24 C25 C26: library part GRM31CR61E476ME44L, "CAP CER 47UF 25V X5R 1206", Dielectric=X5R, LCSC Part Number=C403725, Manufacturer=Murata, Supplier Part Number 1=490-16268-2-ND, Tolerance=20%, Voltage Rating (DC)=25V, Capacitance=47uF, Category="Ceramic Capacitors", ComponentLink1Description=https://search.murata.co.jp/Ceramy/image/img/A01X/partnumbering_e_01.pdf?src-supplier=Digi-Key, ComponentLink1URL=https://search.murata.co.jp/Ceramy/image/img/A01X/partnumbering_e_01.pdf?src-supplier=Digi-Key, Item Type=Capacitor, Length=3.2mm, Manufacturer Part Number=GRM31CR61E476ME44L, RoHS=Yes, Supplier 1=Digi-Key, Thickness=1.6mm, Width=1.6mm
C28: library part CC0402CRNPO9BN6R8, "CAP CER 6.8PF 50V C0G/NPO 0402", Case Code (Imperial)=0402, Case Code (Metric)=1005, Dielectric=C0G, Insulation Resistance=10GR, LCSC Part Number=C189470, Manufacturer=Yageo, Max Operating Temperature=125°C, Min Operating Temperature=-55°C, Supplier Part Number=3247368, Tolerance=2%, Voltage Rating=50V, Case/Package=0402, Category="Ceramic Capacitors", ComponentLink1Description=https://datasheet.ciiva.com/11587/upy-gp-np0-16v-to-50v-8-11587182.pdf?src-supplier=Avnet, ComponentLink1URL=https://datasheet.ciiva.com/11587/upy-gp-np0-16v-to-50v-8-11587182.pdf?src-supplier=Avnet, Construction=Flat, Depth=0.5mm, Height=0.5mm, Item Type=Capacitor, Length=1mm, Manufacturer Part Number=CC0402CRNPO9BN6R8, Mounting Technology="Surface Mount", Packaging="Tape and Reel", Pricing="10000=0.0024, 40000=0.0022, 150000=0.0021, 400000=0.002, 1000000=0.0019 (USD)", Radiation Hardening=No, RoHS=Yes, RoHS Compliant=Yes, Series=CC, Stock=200000, Supplier="Future Electronics", Termination=SMD/SMT, Voltage Rating (DC)=50V, Weight=2.3E-05oz, Width=0.5mm
C29: library part CL10A105KB8NNNC, "CAP CER 1UF 50V X5R 0603", Case Code (Imperial)=0603, Case Code (Metric)=1608, Dielectric=X5R, LCSC Part Number=C15849, Manufacturer=Samsung, Max Operating Temperature=85°C, Min Operating Temperature=-55°C, Tolerance=10%, Voltage Rating=50V, Case/Package=0603, Category="Ceramic Capacitors", ComponentLink1Description=https://datasheet.ciiva.com/26877/getdatasheetpartid-753736-26877879.pdf?src-supplier=Verical, ComponentLink1URL=https://datasheet.ciiva.com/26877/getdatasheetpartid-753736-26877879.pdf?src-supplier=Verical, Depth=0.8mm, Item Type=Capacitor, Length=1.6mm, Manufacturer Part Number=CL10A105KB8NNNC, Material=4241ConductorMaterial, Mounting Technology="Surface Mount", Packaging="Tape and Reel", Pricing="4000=0.01632, 8000=0.01595, 16000=0.01557, 24000=0.0152, 32000=0.01482 (USD)", Radiation Hardening=No, RoHS=Yes, RoHS Compliant=Yes, Series=CL, Stock=780446, Supplier=Avnet, Supplier Part Number=CL10A105KB8NNNC, Voltage Rating (DC)=50V
D1: "TVS DIODE 170VWM 275VC SMB", LCSC Part Number=C1973536, Manufacturer=STMicroelectronics, ComponentLink1Description=https://datasheet.ciiva.com/30514/2017842-30514067.pdf?src-supplier=Jameco, ComponentLink1URL=https://datasheet.ciiva.com/30514/2017842-30514067.pdf?src-supplier=Jameco, ComponentLink2Description=https://datasheet.ciiva.com/337/cd00001366-337837.pdf?src-supplier=Digikey, ComponentLink2URL=https://datasheet.ciiva.com/337/cd00001366-337837.pdf?src-supplier=Digikey, ComponentLink3Description=https://datasheet.ciiva.com/337/cd00001366-337838.pdf?src-supplier=Digikey, ComponentLink3URL=https://datasheet.ciiva.com/337/cd00001366-337838.pdf?src-supplier=Digikey, ComponentLink4Description=https://datasheet.ciiva.com/337/cd00001366-337839.pdf?src-supplier=Digikey, ComponentLink4URL=https://datasheet.ciiva.com/337/cd00001366-337839.pdf?src-supplier=Digikey, ComponentLink5Description=https://datasheet.ciiva.com/7973/1761316-7973541.pdf?src-supplier=Element14, ComponentLink5URL=https://datasheet.ciiva.com/7973/1761316-7973541.pdf?src-supplier=Element14, ComponentLink6Description=https://datasheet.ciiva.com/7973/1761316-7973543.pdf?src-supplier=Element14, ComponentLink6URL=https://datasheet.ciiva.com/7973/1761316-7973543.pdf?src-supplier=Element14, ComponentLink7Description=https://datasheet.ciiva.com/26817/getdatasheetpartid-82970-26817756.pdf?src-supplier=Verical, ComponentLink7URL=https://datasheet.ciiva.com/26817/getdatasheetpartid-82970-26817756.pdf?src-supplier=Verical, ComponentLink8Description=https://datasheet.ciiva.com/16487/cd00001366-16487614.pdf?src-supplier=Future+Electronics, ComponentLink8URL=https://datasheet.ciiva.com/16487/cd00001366-16487614.pdf?src-supplier=Future+Electronics, ComponentLink9Description=https://datasheet.ciiva.com/14535/70014015-14535806.pdf?src-supplier=Allied+Electronics, ComponentLink9URL=https://datasheet.ciiva.com/14535/70014015-14535806.pdf?src-supplier=Allied+Electronics, Item Type="TVS Diodes", Manufacturer Part Number=SMBJ170A-TR, Pricing="1=0.3, 10=0.231, 50=0.231, 100=0.167, 1000=0.122, 10000=0.115 (USD)", RoHS=Yes, Stock=8410, Supplier=Mouser
D2: "DIODE STANDARD 1000V 1A SMA", Current Rating=1A, LCSC Part Number=C99333, Manufacturer=Diodes, Reverse Voltage=1kV, ComponentLink1Description=https://datasheet.ciiva.com/27052/1542696-27052440.pdf?src-supplier=Jameco, ComponentLink1URL=https://datasheet.ciiva.com/27052/1542696-27052440.pdf?src-supplier=Jameco, ComponentLink2Description=https://datasheet.ciiva.com/4454/ds16008-60440-4454096.pdf?src-supplier=Mouser, ComponentLink2URL=https://datasheet.ciiva.com/4454/ds16008-60440-4454096.pdf?src-supplier=Mouser, ComponentLink3Description=https://datasheet.ciiva.com/8301/ds16008-8301519.pdf?src-supplier=Avnet, ComponentLink3URL=https://datasheet.ciiva.com/8301/ds16008-8301519.pdf?src-supplier=Avnet, ComponentLink4Description=https://datasheet.ciiva.com/8303/ds16008-8303103.pdf?src-supplier=Avnet, ComponentLink4URL=https://datasheet.ciiva.com/8303/ds16008-8303103.pdf?src-supplier=Avnet, ComponentLink5Description=https://datasheet.ciiva.com/917/ds16008-917195.pdf?src-supplier=Digikey, ComponentLink5URL=https://datasheet.ciiva.com/917/ds16008-917195.pdf?src-supplier=Digikey, ComponentLink6Description=https://datasheet.ciiva.com/917/ds16008-917196.pdf?src-supplier=Digikey, ComponentLink6URL=https://datasheet.ciiva.com/917/ds16008-917196.pdf?src-supplier=Digikey, ComponentLink7Description=https://datasheet.ciiva.com/22695/1906610-22695853.pdf?src-supplier=Element14, ComponentLink7URL=https://datasheet.ciiva.com/22695/1906610-22695853.pdf?src-supplier=Element14, Item Type=Diodes, Lead Free=5697LeadFree, Manufacturer Part Number=US1M-13-F, Output Current=1A, Polarity=4901Direction, Pricing="5000=0.02564, 10000=0.02516, 20000=0.02503, 30000=0.0249, 40000=0.02477 (USD)", RoHS=Yes, Stock=29030000, Supplier=Avnet, Voltage Rating (DC)=1kV
D3: "200V Independent Type 4A 860mV@4A SMC(DO-214AB) Schottky Diodes ROHS", LCSC Part Number=C5563749, Manufacturer=FUXINSEMI, Package=SMC(DO-214AB), ComponentLink1Description=LCSC, ComponentLink1URL=https://www.lcsc.com/product-detail/Schottky-Diodes_FUXINSEMI-MBRS4201T3G_C5563749.html?s_z=n_%2520MBRS4201T3G, Item Type=Diode, Manufacturer Part Number=MBRS4201T3G
D4: "DIODE SCHOTTKY 100V 1A SOD123W", Average Rectified Current=1A, LCSC Part Number=C179426, Manufacturer=Nexperia, Max Forward Surge Current (Ifsm)=50A, Max Reverse Current=150nA, Max Reverse Voltage (DC)=100V, ComponentLink1Description=http://www.farnell.com/datasheets/2170364.pdf?src-supplier=Farnell, ComponentLink1URL=http://www.farnell.com/datasheets/2170364.pdf?src-supplier=Farnell, ComponentLink2Description=https://assets.nexperia.com/documents/data-sheet/PMEG10010ELR.pdf?src-supplier=Digikey, ComponentLink2URL=https://assets.nexperia.com/documents/data-sheet/PMEG10010ELR.pdf?src-supplier=Digikey, ComponentLink3Description=https://datasheet.octopart.com/PMEG10010ELRX-Nexperia-datasheet-67796196.pdf?src-supplier=Future+Electronics, ComponentLink3URL=https://datasheet.octopart.com/PMEG10010ELRX-Nexperia-datasheet-67796196.pdf?src-supplier=Future+Electronics, ComponentLink4Description=http://www.farnell.com/datasheets/2170364.pdf?src-supplier=Newark, ComponentLink4URL=http://www.farnell.com/datasheets/2170364.pdf?src-supplier=Newark, Forward Current=1A, Height=1.1mm, Item Type="Schottky Diodes", Lead Free=5697LeadFree, Manufacturer Part Number=PMEG10010ELRX, Mounting Technology=8Mount, Pricing="3000=0.0482, 9000=0.047, 15000=0.0464, 30000=0.0457, 60000=0.0446 (USD)", Reach SVHC Compliant=4186SVHC, Reverse Recovery Time=3.7ns, Reverse Voltage=100V, RoHS=Yes, RoHS Compliant=Yes, Stock=282000, Supplier="Future Electronics"
D5: "6V 5V SOD-123 ESD and Surge Protection (TVS/ESD) ROHS", LCSC Part Number=C7079241, Manufacturer=AMAZING, Package=SOD-123, ComponentLink1Description=LCSC, ComponentLink1URL=https://www.lcsc.com/product-detail/ESD-and-Surge-Protection-TVS-ESD_AMAZING-AZ3005-01G_C7079241.html, Item Type=(TVS/ESD), Manufacturer Part Number=AZ3005-01G
F1: "FUSE BRD MNT 3A 125VAC/VDC 2SMD", Flammability Rating=5813Flammability, LCSC Part Number=C206912, Manufacturer=Littelfuse, ComponentLink1Description=https://datasheet.ciiva.com/29697/1708924-29697492.pdf?src-supplier=Jameco, ComponentLink1URL=https://datasheet.ciiva.com/29697/1708924-29697492.pdf?src-supplier=Jameco, ComponentLink2Description=https://datasheet.ciiva.com/14102/aa154xxx-data-e-14102960.pdf?src-supplier=Distrelec, ComponentLink2URL=https://datasheet.ciiva.com/14102/aa154xxx-data-e-14102960.pdf?src-supplier=Distrelec, ComponentLink3Description=https://datasheet.ciiva.com/28499/88932-28499727.pdf?src-supplier=Element14, ComponentLink3URL=https://datasheet.ciiva.com/28499/88932-28499727.pdf?src-supplier=Element14, ComponentLink4Description=https://datasheet.ciiva.com/1268/154-1268659.pdf?src-supplier=Element14, ComponentLink4URL=https://datasheet.ciiva.com/1268/154-1268659.pdf?src-supplier=Element14, Item Type=Fuses, Lead Free=5697LeadFree, Manufacturer Part Number=0154003.DR, Pricing="1=2.71, 5=2.246, 10=2.073, 50=1.7196, 100=1.5862, 250=1.425, 500=1.3135 (USD)", RoHS=Yes, RoHS Compliant=5897YesNo, Stock=5902, Supplier=Digikey
J1: "1x2P 18A -40℃~+105℃ 250V Black 12~30 Straight pin 5.08mm 2.5 1 2 Plugin,P=5.08mm Screw terminal ROHS", LCSC Part Number=C430601, Manufacturer=DIBO, Package=Plugin,P=5.08mm, ComponentLink1Description=LCSC, ComponentLink1URL=https://www.lcsc.com/product-detail/Screw-terminal_span-style-background-color-ff0-DIBO-span-DB128L-5-08-2P-BK-S_C430601.html, Item Type="Terminal Block", Manufacturer Part Number=DB128L-5.08-2P-BK-S
J2: "1x3P 3P XH 1 Tin 2.5mm 3 -25℃~+85℃ Brass 3A Straight Plugin,P=2.5mm Wire To Board Connector ROHS", LCSC Part Number=C2908601, Manufacturer=HCTL, Package=Plugin,P=2.5mm, Item Type="Wire To Board Connector", Manufacturer Part Number=XH-3A
J3 J4: "-"
L1: "CMC 1MH 2A 2LN TH", Manufacturer="Wurth Electronics", Supplier Part Number=710-744821201, ComponentLink1Description=https://datasheet.ciiva.com/4952/744821201-87450-4952378.pdf?src-supplier=Mouser, ComponentLink1URL=https://datasheet.ciiva.com/4952/744821201-87450-4952378.pdf?src-supplier=Mouser, ComponentLink2Description=https://datasheet.ciiva.com/1008/744821201-1008592.pdf?src-supplier=Digikey, ComponentLink2URL=https://datasheet.ciiva.com/1008/744821201-1008592.pdf?src-supplier=Digikey, ComponentLink3Description=https://datasheet.ciiva.com/11796/0900766b804ac268-11796620.pdf?src-supplier=Rs, ComponentLink3URL=https://datasheet.ciiva.com/11796/0900766b804ac268-11796620.pdf?src-supplier=Rs, ComponentLink4Description=https://datasheet.ciiva.com/7211/70377-7211245.pdf?src-supplier=Newark, ComponentLink4URL=https://datasheet.ciiva.com/7211/70377-7211245.pdf?src-supplier=Newark, ComponentLink5Description=https://datasheet.ciiva.com/7892/1736513-7892972.pdf?src-supplier=Element14, ComponentLink5URL=https://datasheet.ciiva.com/7892/1736513-7892972.pdf?src-supplier=Element14, ComponentLink6Description=https://datasheet.ciiva.com/14124/to744821201-data-de-14124987.pdf?src-supplier=Distrelec, ComponentLink6URL=https://datasheet.ciiva.com/14124/to744821201-data-de-14124987.pdf?src-supplier=Distrelec, Item Type="Fixed Inductors", Manufacturer Part Number=744821201, Pricing="1=3.6, 10=3.33, 50=2.98, 100=2.62, 1000=2.34, 10000=2.34 (USD)", RoHS=Yes, Stock=341, Supplier=Mouser
L2: "3.4A 1uH ±30% 5.9A SMD,4x4mm Power Inductors ROHS", LCSC Part Number=C520322, Manufacturer=Ceaiya, Package=SMD,4x4mm, ComponentLink1Description=LCSC, ComponentLink1URL=https://www.lcsc.com/product-detail/Power-Inductors_Ceaiya-CR4030-1R0N_C520322.html?s_z=n_B82462G4102M, Item Type=Inductor, Manufacturer Part Number=CR4030-1R0N
L3: library part YSLF1045-4R7M, "4.5A 4.7uH ±20% SMD,10.1x10.1mm Power Inductors ROHS", LCSC Part Number=C693870, Manufacturer=YJYCOIN, Package=SMD,10.1x10.1mm, ComponentLink1Description=LCSC, ComponentLink1URL=https://www.lcsc.com/product-detail/Power-Inductors_YJYCOIN-YSLF1045-4R7M_C693870.html, Item Type=Inductor, Manufacturer Part Number=YSLF1045-4R7M
L4: library part SRP1265A-150M, "FIXED IND 15UH 9A 28 MOHM SMD", LCSC Part Number=C189912, Manufacturer=Bourns, ComponentLink1Description=http://www.mouser.com/ds/2/54/SRP1265A-558458.pdf?src-supplier=Mouser, ComponentLink1URL=http://www.mouser.com/ds/2/54/SRP1265A-558458.pdf?src-supplier=Mouser, ComponentLink2Description=https://media.digikey.com/pdf/Data%20Sheets/Bourns%20PDFs/SRP_Series_Bltn.pdf?src-supplier=Digikey, ComponentLink2URL=https://media.digikey.com/pdf/Data%20Sheets/Bourns%20PDFs/SRP_Series_Bltn.pdf?src-supplier=Digikey, ComponentLink3Description=http://components.arrow.com/part/dataview/66888460S852199N9116?src-supplier=Arrow+Electronics, ComponentLink3URL=http://components.arrow.com/part/dataview/66888460S852199N9116?src-supplier=Arrow+Electronics, ComponentLink4Description=http://www.farnell.com/datasheets/2059704.pdf?src-supplier=Farnell, ComponentLink4URL=http://www.farnell.com/datasheets/2059704.pdf?src-supplier=Farnell, ComponentLink5Description=http://uk.rs-online.com/webdocs/133a/0900766b8133ab5d.pdf?src-supplier=Rs, ComponentLink5URL=http://uk.rs-online.com/webdocs/133a/0900766b8133ab5d.pdf?src-supplier=Rs, ComponentLink6Description=http://www.alliedelec.com/images/products/datasheets/bm/BOURNS/70377570.pdf?src-supplier=Allied+Electronics, ComponentLink6URL=http://www.alliedelec.com/images/products/datasheets/bm/BOURNS/70377570.pdf?src-supplier=Allied+Electronics, ComponentLink7Description=https://datasheet.octopart.com/SRP1265A-150M-Bourns-datasheet-57227458.pdf?src-supplier=Newark, ComponentLink7URL=https://datasheet.octopart.com/SRP1265A-150M-Bourns-datasheet-57227458.pdf?src-supplier=Newark, ComponentLink8Description=http://www.bourns.com/data/global/pdfs/SRP1265A.pdf?src-supplier=Avnet, ComponentLink8URL=http://www.bourns.com/data/global/pdfs/SRP1265A.pdf?src-supplier=Avnet, ComponentLink9Description=http://www.farnell.com/datasheets/2059704.pdf?src-supplier=Newark, ComponentLink9URL=http://www.farnell.com/datasheets/2059704.pdf?src-supplier=Newark, ComponentLink10Description=http://www.farnell.com/datasheets/2059704.pdf?src-supplier=Element14, ComponentLink10URL=http://www.farnell.com/datasheets/2059704.pdf?src-supplier=Element14, Item Type=Inductors, Manufacturer Part Number=SRP1265A-150M, Pricing="1=1.86, 10=1.446, 25=1.3076, 50=1.2114, 100=1.1221, 250=1.0136 (USD)", RoHS=Yes, Stock=3333, Supplier=Digikey
L5: "XFMR FLYBACK AC/DC CONV 280UH TH", Manufacturer="Wurth Electronics", Supplier Part Number=1297-750343466-ND, Item Type=Transformer, Manufacturer Part Number=750343466, Pricing="1=7.36, 10=6.646, 25=6.3768, 70=6.08471, 140=5.89457, 280=5.70964, 490=5.56402, 980=5.38821 (USD)", RoHS=Yes, RoHS Compliant=Yes, Stock=112, Supplier=Digikey
NT1: "Net Tie SMD", Manufacturer Part Number="Net Tie", Item Type="Net Tie Pad"
Q1: "650V 7A 0.6Ω@10V,3.5A 63W 4V 1 N-channel TO-252-2 MOSFETs ROHS", LCSC Part Number=C509119, Manufacturer=SPS, Package=TO-252-2, ComponentLink1Description=LCSC, ComponentLink1URL=https://www.lcsc.com/product-detail/MOSFETs_SPS-SM600R65CT9RL_C509119.html?s_z=n_TK7P65W, Item Type=Mosfet, Manufacturer Part Number=SM600R65CT9RL